# Altium PCB esp32p10displayPCB1.PcbDoc (part 2 of 3)
Units mil, origin at the board's own origin, x right, y up, seen from the top; angles counter-clockwise.
Board outline 3760 x 6044 mil, 2 copper layers (Top Layer, Bottom Layer); 134 components, 104 nets, 470 pads, 215 vias.
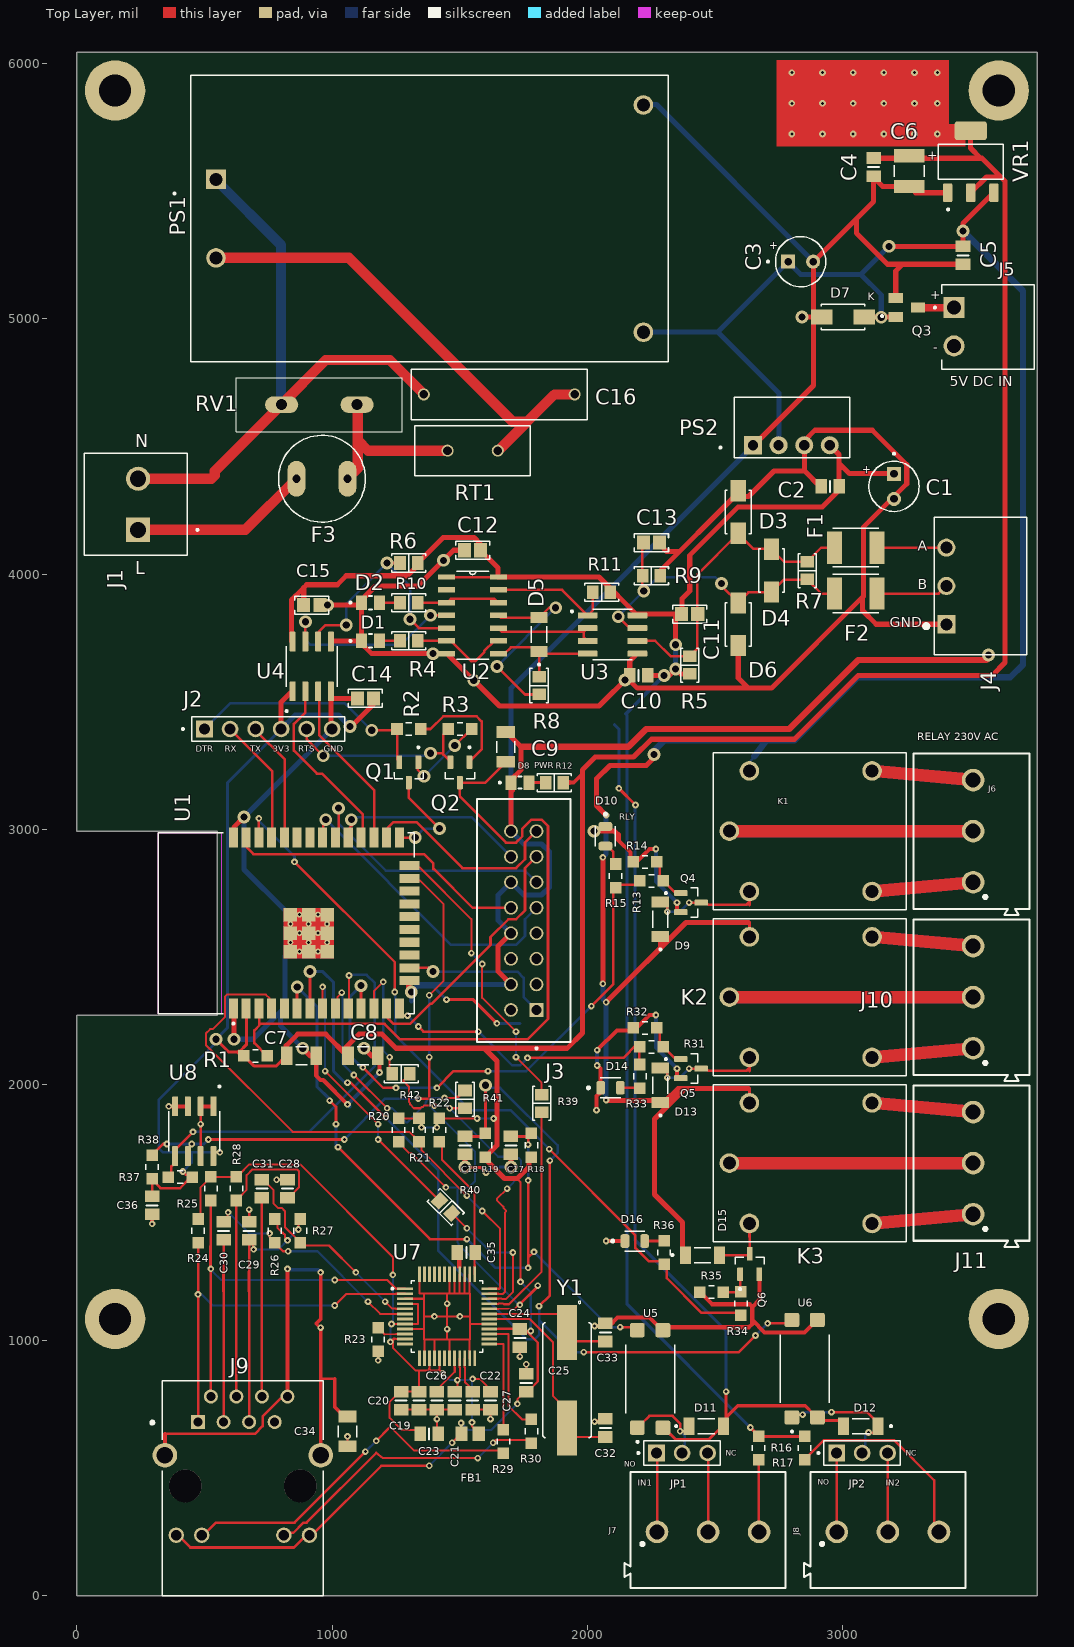
[diagram p0: Top Layer view]

## Via types
v1: diameter 26, hole 12, Top Layer to Bottom Layer, tented both sides, 166 vias
v2: diameter 50, hole 28, Top Layer to Bottom Layer, tented both sides, 49 vias

## Nets (pads, with @x,y where several pads share a name; then routed paths per layer and width w, separated by ;. In a path a pad name is that pad's centre, name@x,y a point inside that pad or via, vN(x,y) a via of type N, cw(c..) or ccw(c..) an arc to the next point about the centre after c; other vN are vias at no path point) (continued)
DI: (continued)
  Top Layer w10: U2.8@1652,3689 1650,3689 1675,3689 1700,3714 1795,3714 D5.C@1810,3699 ; R8.2@1810,3598.45 1810,3599 D5.C@1810,3699 ; D5.C@1810,3689 2000,3689 U3.4@2000.51,3689 ; D5.C@1810,3699 D5.C@1810,3696.87 D5.C@1810,3699
DTR: J2.1 Q1.2 R2.1 | length 977.7
  Top Layer w10: v2(1155,3389) R2.1@1255,3389 ; R2.1@1253.74,3394 1255,3394 1255,3274 1265,3264 Q1.2@1262.6,3263.96
  Bottom Layer w10: J2.1@500,3394 600,3494 1050,3494 v2(1155,3389)
EN: C9.1 Q2.3 R1.2 U1.3 | length 2915.3
  Top Layer w10: U1.3@712.91,2299.35 715,2299 715,2234 695,2214 695,2164 745,2114 R1.2@746.26,2114 ; 715,2239 1205,2239 1265,2179 1765,2179 1845,2259 1845,3014 1820,3039 1780,3039 1745,3004 1745,2974 1720,2949 1680,2949 1500,3129 Q2.3@1500,3184.04 1600,3184 1680,3264 C9.1@1680,3265.93
ESP_CS: R42.1 U1.12 | length 494.5
  Top Layer w8: U1.12@1162.91,2299.35 1162.91,2366.91 v1(1200,2404) ; v1(1225,2109) 1225,2054 R42.1@1235,2044
  Bottom Layer w8: v1(1200,2404) 1200,2134 v1(1225,2109)
ESP_MISO: R40.1 U1.8 | length 1111.5
  Top Layer w8: U1.8@962.91,2299.35 v1(962.9,2384) ; v1(972.5,2054) v1(1180,1846.5) ; v1(1180,1786.5) R40.1@1420.17,1546.33
  Bottom Layer w8: v1(962.9,2384) 972,2375 v1(972.5,2054) ; v1(1180,1786.5) v1(1180,1846.5)
ESP_MOSI: R41.1 U1.9 | length 955.6
  Top Layer w8: U1.9@1020,2329 1020,2344 v1(1037.5,2361.5) ; v1(1085,2039) v1(1215,1909) ; v1(1440,1949) 1480,1949 1485,1954 1495,1954 R41.1@1520,1979
  Bottom Layer w8: v1@1040,2364 1040,2084 v1(1085,2039) ; v1(1215,1909) 1235,1909 1290,1854 1295,1854 1365,1924 1365,1934 1370,1934 1370,1939 1380,1949 v1(1440,1949)
ESP_SCLK: R39.1 U1.24 | length 1096.7
  Top Layer w8: U1.24@1332.5,2851.5 1342.5,2851.5 1545,2649 v1(1545,2516.5) ; v1(1587.5,2474) 1587.5,2341.5 v1(1720,2209) ; v1(1720,2109) 1820,2009 R39.1@1820,1962.55
  Bottom Layer w8: v1(1545,2516.5) v1(1587.5,2474) ; v1(1720,2109) v1(1720,2209)
ETH_ACT: R30.1 U7.27 | length 468.8
  Top Layer w8: U7.27@1614.57,1025.1 1650.28,1025.1 1690,1025.1 1690,744 1743.74,690.26 R30.1@1780,690.26
ETH_CS: R20.1 R42.2 U7.32 | length 1901.1
  Top Layer w7: 1650,1124 1715,1124
  Top Layer w8: R20.1@1260,1779 1260,1774 1300,1734 1310,1734 v1(1445,1599) ; R42.2@1305,2044 1280,2019 1280,2014 1300,1994 1300,1934 1305,1929 1305,1924 1320,1909 1345,1909 1350,1914 1355,1914 1360,1919 v1(1400,1919) ; U7.32@1614.57,1123.53 1650.28,1123.53 ; 1715,1124 v1(1805,1214) 1805,1209 v1(1735,1139)
  Bottom Layer w8: v1(1400,1919) 1390,1909 1560,1739 1560,1624 1535,1599 1515,1599 1510,1594 1495,1594 ; v1(1445,1599) 1490,1599 1495,1594 ; v1(1735,1139) 1730,1139 1495,1374 1495,1379 1490,1384 1490,1589 1495,1594
ETH_EXRES: R23.2 U7.10 | length 101.9
  Top Layer w7: 1205,1024 1250,1024
  Top Layer w8: R23.2@1190,1039 1205,1024 ; 1249.72,1025.1 U7.10@1285.43,1025.1
ETH_INT: R21.1 U1.4 U7.36 | length 2132.6
  Top Layer w8: U1.4@755,2329 755,2339 740,2354 587.5,2354 580.5,2347 580.5,2267 532.5,2219 522.5,2219 505,2201.5 505,2156.5 845,1816.5 1302.5,1816.5 R21.1@1330,1789 ; R21.1@1350,1766.5 1350,1744 v1(1527.5,1566.5) ; v1(1587.5,1506.5) 1657.5,1436.5 1657.5,1204 1655,1201.5 1650,1201.5 ; U7.36@1614.57,1202.27 1650.28,1202.27
  Bottom Layer w8: v1(1527.5,1566.5) v1(1587.5,1506.5)
ETH_LED_G: J9.10 R29.2 | length 1365.2
  Top Layer w8: 1227.5,661.5 1320,569 R29.2@1660,569
  Top Layer w10: J9.10@502.5,244 545,286.5 852.5,286.5 v1(1130,564) ; v1(1172.5,606.5) 1225,659
  Bottom Layer w10: v1(1130,564) v1(1172.5,606.5)